# Altium PCB iMX6 Rex Development Baseboard V1I1_PCB.PcbDoc (part 3 of 6)
Units mm, origin at the board's own origin, x right, y up, seen from the top; angles counter-clockwise.
Board outline 135 x 110 mm, 6 copper layers (L1, L2, L3, L4 (PWR), L5, L6), stack 1.542 mm thick; 580 components, 458 nets, 2100 pads, 1201 vias.
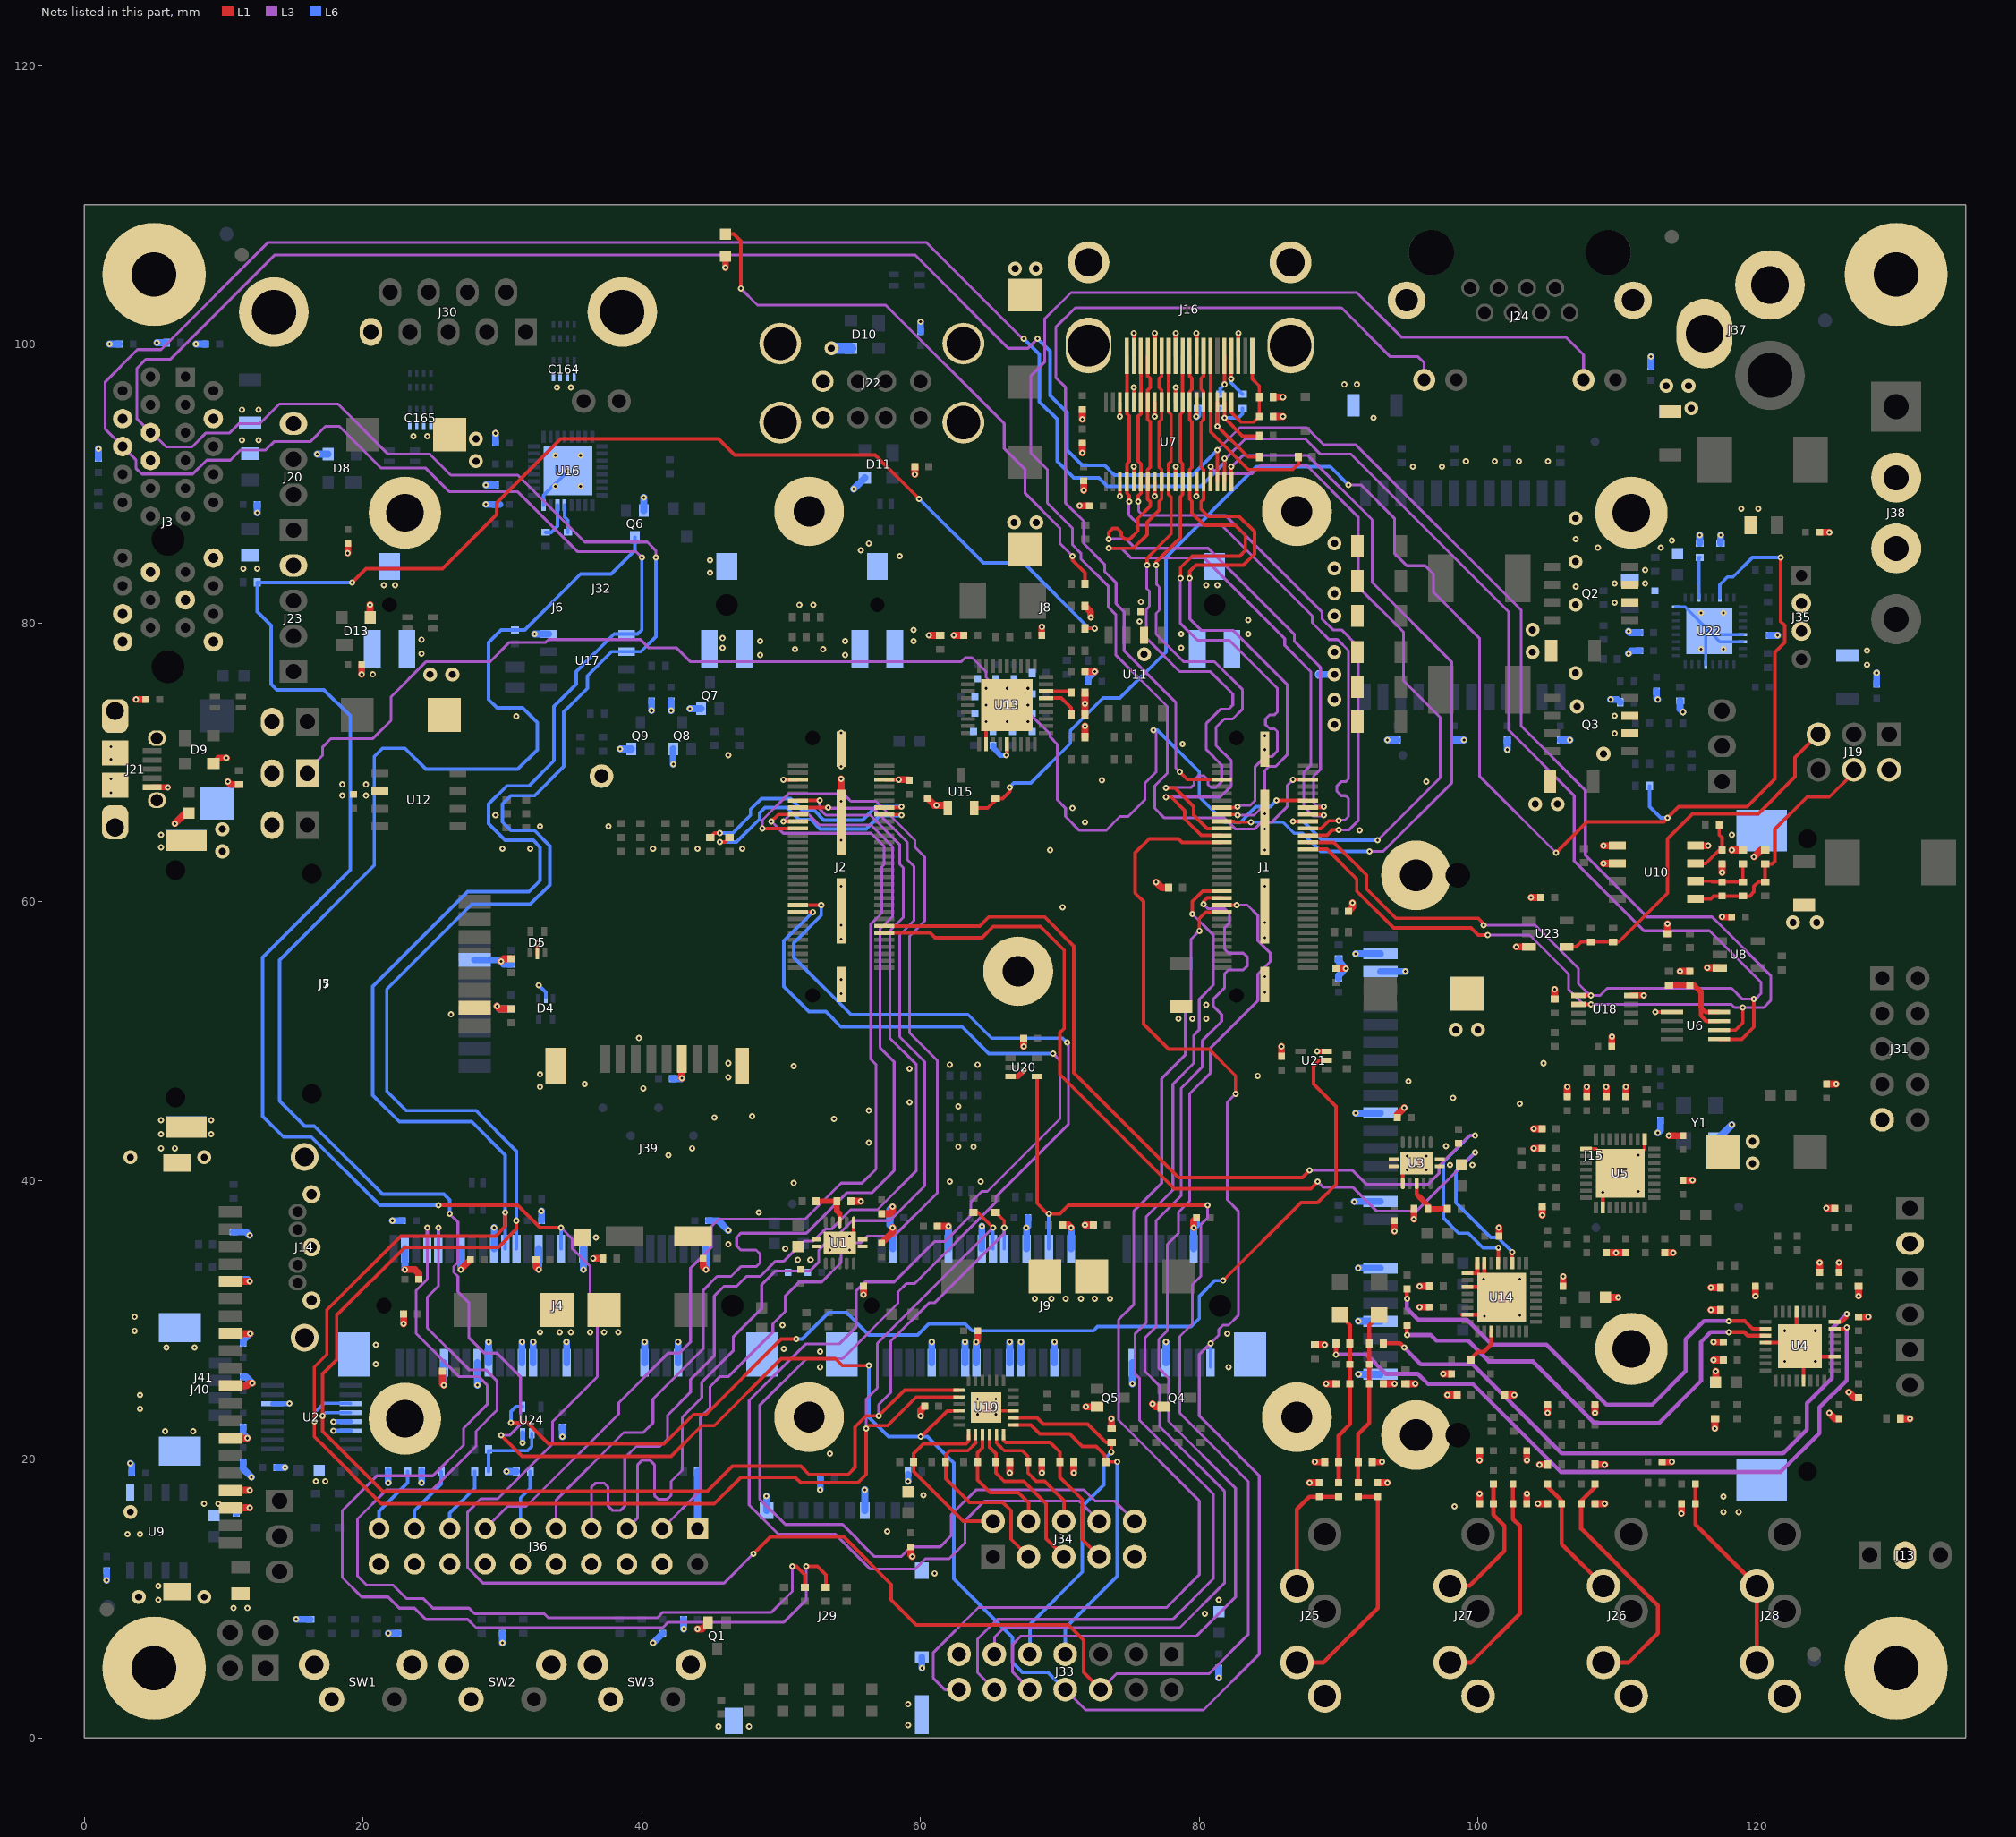
[diagram p7: the nets of this part, all layers, seen from the top]

## Via types
v1: diameter 0.45, hole 0.2, L1 to L6, tented both sides, 1092 vias
v2: diameter 1, hole 0.5, L1 to L6, tented both sides, 109 vias

## Nets (pads, with @x,y where several pads share a name; then routed paths per layer and width w, separated by ;. In a path a pad name is that pad's centre, name@x,y a point inside that pad or via, vN(x,y) a via of type N, cw(c..) or ccw(c..) an arc to the next point about the centre after c; other vN are vias at no path point) (continued)
AUD_OUT_R: C141.1 U14.11 | length 2.9
  L1 w0.3: C141.1@99.5,27.1 99.5,27.2 100,27.7 100.4,27.7 100.95,28.25 U14.11@100.95,29.15
BKLT_ADJ: C84.2 J19.4 R57.1 R59.2 R60.2 U10.1 | length 17.7
  L1 w0.25: U10.1@115.6,60.195 116.695,60.195 116.9,60.4 C84.2@117.5,60.4 R60.2@119,60.4 119.5,60.4 119.8,60.7 119.8,61.1 120.1,61.4 R57.1@120.6,61.4 R59.2@120.6,62.7 121.1,62.7 121.3,62.9 121.3,65.2 123.6,67.5 125.2,67.5 126.96,69.26 J19.4@126.96,69.46
BKLT_IN+: C81.1 R58.1 U10.3 | length 4.2
  L1 w0.25: U10.3@115.6,62.735 116.335,62.735 117.3,63.7 C81.1@117.5,63.7 117.5,64.6 117.3,64.8 R58.1@117.3,65.5
BKLT_IN-: C84.1 R60.1 R61.1 U10.2 | length 4.7
  L1 w0.25: U10.2@115.6,61.465 116.735,61.465 116.8,61.4 C84.1@117.5,61.4 R60.1@119,61.4 R61.1@119,62.7
BOOT_MODE: J1.50 JP2.1 | length 96.4
  L1 w0.25: v1(85.53,67.25) J1.50@87.79,67.25
  L3 w0.2: JP2.1@16,69.2 16,69.4 17.1,70.5 17.1,71.1 17.7,71.7 20.7,71.7 22,73 22,74.7 24.5,77.2 29.1,77.2 30.5,78.6 33.1,78.6 33.3,78.8 39.9,78.8 40.5,78.2 42.5,78.2 43.5,77.2 62.9,77.2 63.2,77.5 63.7,77.5 64.7,76.5 64.7,76.093 66.193,74.6 66.493,74.6 67.593,73.5 67.807,73.5 69.3,72.007 69.3,71.8 69.8,71.3 69.8,67.3 70.4,66.7 70.4,66.1 71.4,65.1 73.3,65.1 74.3,66.1 74.9,66.1 76.1,67.3 76.1,68.5 76.9,69.3 76.9,72.1 v1(76.7,72.3)
  L6 w0.25: v1(76.7,72.3) 77,72.3 80,69.3 80,67.5 81.8,65.7 82.957,65.7 84.057,66.8 85.08,66.8 v1(85.53,67.25)
BUF_LVDS0_CABC: J19.5 R157.1 R158.1 U23.4 | length 27.5
  L1 w0.25: U23.4@106.35,56.75 107.05,56.75 107.4,57.1 R157.1@108.1,57.1 R158.1@109.7,57.1 110.1,57.1 113.6,60.6 113.6,64.5 115.4,66.3 120.1,66.3 122.75,68.95 122.75,70.33 J19.5@124.42,72
BUF_SYS_RSTN: J4.22 J9.22 J33.6 R13.2 R170.2 U20.4 | length 297.1
  L1 w0.25: v1(19.2,82.9) 20.2,83.9 25.7,83.9 29.582,87.782 29.582,88.6 34.182,93.2 ; v1(25.4,38.2) 31.1,38.2 32.7,36.6 v1(34.2,36.6) ; 34.207,93.2 45.5,93.2 46.65,92.05 56.75,92.05 v1(59.9,88.9) ; v1(48,13.2) 49.22,14.42 54.48,14.42 57.9,11 57.9,9.9 59.7,8.1 70.6,8.1 71.7,7 71.7,4.68 J33.6@72.92,3.46 ; U20.4@68.35,47.45 68.35,38.35 69.1,37.6 v1(69.2,37.6) 70,37.6 70.6,38.2 v1(80.6,38.2) ; R170.2@71.8,79.6 v1(72.5,79.6)
  L3 w0.2: v1(34.2,36.6) 35.007,35.793 35.007,35.1 36.3,33.807 36.3,30.8 36.8,30.3 36.8,25.9 33.6,22.7 33.6,21.1 29.65,17.15 28.45,17.15 27.5,16.2 27.5,12.2 28.6,11.1 45.9,11.1 v1(48,13.2) ; J33.6@72.92,3.46 74.06,4.6 80.7,4.6 83.5,7.4 83.5,18.4 78.6,23.3 78.6,28.8 79.5,29.7 79.5,32.5 80.1,33.1 80.1,36.807 80.6,37.307 v1(80.6,38.2)
  L6 w0.25: v1(19.2,82.9) R13.2@12.4,82.9 12.4,80.8 13.4,79.8 13.4,75.6 13.8,75.2 17.2,75.2 19.075,73.325 19.075,62.275 12.8,56 12.8,44.6 14.3,43.1 16.3,43.1 21.2,38.2 v1(25.4,38.2) ; J4.22@34.2,35.1 v1(34.2,36.6) ; v1(59.9,88.9) 64.5,84.3 67.4,84.3 72.1,79.6 v1(72.5,79.6) ; J9.22@69.2,35.1 v1(69.2,37.6)
BUFF_RST_BTNN: U21.2 U24.4 | length 82.3
  L1 w0.25: v1(30.6,22.6) 31.8,22.6 33.3,21.1 41.6,21.1 43.7,23.2 44.593,23.2 49.993,28.6 v1(51.1,28.6) ; v1(81.7,32.8) 87.3,38.4 88.5,38.4 89.8,39.7 89.8,45.3 88.2,46.9 88.2,48.2 88.6,48.6 U21.2@89.15,48.6
  L6 w0.25: v1(30.6,22.6) 30.6,23.4 30.95,23.75 U24.4@31.45,23.75 ; v1(51.1,28.6) 51.5,28.6 53.4,30.5 54.7,30.5 56.3,28.9 59.8,28.9 60.6,29.7 63.2,29.7 63.7,29.2 72.4,29.2 72.7,29.5 79.4,29.5 80,30.1 80,31.7 81.1,32.8 v1(81.7,32.8)
CFG_SEL0: R80.2 U13.24 | length 2.6
  L1 w0.25: U13.24@69,74.6 70.1,74.6 70.8,73.9 R80.2@70.8,73.4
CFG_SEL1: R79.2 U13.25 | length 1.8
  L1 w0.25: U13.25@69,75.1 70.7,75.1 R79.2@70.8,75
CLK1_N: J2.46 R1.1 R2.1 | length 17.4
  L1 w0.25: v1(45.6,64.275) 45.975,64.275 R2.1@46.3,64.6 ; J2.46@57.39,66.25 58.58,66.25 v1(58.63,66.2)
  L6 w0.25: v1@45.625,64.275 46.794,64.275 48.45,65.931 48.45,66.35 48.85,66.75 50.4,66.75 51.281,65.869 52.131,65.869 52.79,65.21 56.104,65.21 57.069,66.175 58.605,66.175 v1(58.63,66.2)
CLK1_P: J2.48 R3.1 R4.1 | length 17.4
  L1 w0.25: R4.1@44.9,64.6 45.225,64.925 v1(45.6,64.925) ; J2.48@57.39,66.75 58.58,66.75 v1(58.63,66.8)
  L6 w0.25: v1(45.6,64.925) 46.525,64.925 47.8,66.2 47.8,66.619 48.581,67.4 50.669,67.4 51.55,66.519 52.4,66.519 53.06,65.86 55.835,65.86 56.8,66.825 58.605,66.825 v1(58.63,66.8)
CPU_INT: J1.37 J9.1 J33.8 Q6.3 R112.2 U19.22 | length 256.9
  L1 w0.24: 62.2,23.45 U19.22@62.75,23.45
  L1 w0.25: v1(29.9,21.7) 31.4,20.2 42.1,20.2 44.3,22.4 45.2,22.4 50,27.2 53.9,27.2 54.4,26.7 v1(56.3,26.7) ; v1(60,21.6) 60.05,21.6 61.9,23.45 62.2,23.45 ; J1.37@81.61,64.25 78.75,64.25 78.5,64.5 76.4,64.5 75.4,63.5 75.4,60.6 76,60 76,51.2 77.8,49.4 80.7,49.4 82.6,47.5 v1(82.6,46.2)
  L3 w0.2: v1(26.2,37.6) 26.8,37 26.8,34.107 26.5,33.807 26.5,33.393 26.793,33.1 26.8,33.1 26.8,32 27.6,31.2 27.6,28.7 28.7,27.6 29.6,27.6 31.3,25.9 31.3,22.5 30.5,21.7 v1(29.9,21.7) ; J33.8@70.38,3.46 71.84,2 80.3,2 84.3,6 84.3,18.8 80,23.1 80,27.5 v1(80.8,28.3) 81.4,28.9 81.4,29.3 81.7,29.6 82.1,29.6 82.8,30.3 82.8,37.8 82,38.6 82,45.6 v1(82.6,46.2)
  L6 w0.25: v1(26.2,37.6) 26.2,38.6 25.8,39 21.4,39 16.5,43.9 15.8,43.9 14,45.7 14,55.8 20.8,62.6 20.8,70.407 21.393,71 23,71 24.5,69.5 31.1,69.5 32.5,70.9 32.5,72.85 31.45,73.9 29.6,73.9 29,74.5 29,78.6 29.9,79.5 R112.2@30.9,79.5 31.6,79.5 35.6,83.5 37.8,83.5 39.5,85.2 Q6.3@39.5,86.15 ; v1(56.3,26.7) 56.3,23 57.7,21.6 v1(60,21.6) 60.507,21.6 62.4,19.707 62.4,11.4 66.6,7.2 66.6,5.4 67.3,4.7 69.14,4.7 J33.8@70.38,3.46 ; J9.1@80.8,26.6 v1(80.8,28.3)
CRFILT: C107.1 U13.14 | length 2.1
  L1 w0.25: v1(66.15,70.5) 66.2,70.55 U13.14@66.2,71.3
  L6 w0.4: C107.1@65.2,71.2 65.2,71.05 65.75,70.5 v1(66.15,70.5)
CSPI2_CLK: J1.17 J33.14 | length 79.1
  L1 w0.25: v1(80,57.9) 80,58.8 80.45,59.25 J1.17@81.61,59.25
  L3 w0.2: J33.14@62.76,3.46 61.74,3.46 60.9,4.3 60.9,6.1 64.15,9.35 77.65,9.35 80,11.7 80,17 74.2,22.8 74.2,30 75.3,31.1 75.3,37.8 77.3,39.8 77.3,47.3 79,49 79,52.5 79.4,52.9 79.4,57.3 v1(80,57.9)
CSPI2_CS0: J1.19 J33.10 | length 78.9
  L1 w0.25: J1.19@81.61,59.75 v1(82.67,59.75)
  L3 w0.2: J33.10@67.84,3.46 66.6,4.7 66.6,6.7 67.2,7.3 79.8,7.3 82.6,10.1 82.6,17.9 77.8,22.7 77.8,25.8 77.1,26.5 77.1,28.607 77.7,29.207 77.7,35.4 78.5,36.2 78.5,37.7 79.3,38.5 79.3,46.2 80.8,47.7 80.8,49.5 84.2,52.9 84.2,54.807 85.1,55.707 85.1,56.293 84.2,57.193 84.2,59 83.45,59.75 v1(82.67,59.75)
CSPI2_MISO: J1.21 J33.11 | length 79.1
  L1 w0.25: v1(80.3,59.8) 80.3,60 80.55,60.25 J1.21@81.61,60.25
  L3 w0.2: J33.11@65.3,6 65.3,7.2 66,7.9 78.6,7.9 81.8,11.1 81.8,17.7 77.15,22.35 77.15,25.25 76.1,26.3 76.1,28.7 76.9,29.5 76.9,37.1 78.7,38.9 78.7,46.6 80.2,48.1 80.2,50 81.6,51.4 81.6,51.9 81,52.5 81,53 81.8,53.8 81.8,54.8 82.1,55.1 83.16,55.1 83.46,55.4 83.46,56 83.16,56.3 82.1,56.3 81.8,56.6 81.8,58.1 82.17,58.47 82.17,59.13 81.8,59.5 80.6,59.5 v1(80.3,59.8)
CSPI2_MOSI: J1.23 J33.12 | length 79.1
  L1 w0.25: v1(79.5,59.1) 79.5,60 80.25,60.75 J1.23@81.61,60.75
  L3 w0.2: J33.12@65.3,3.46 64.1,4.66 64.1,7.1 65.5,8.5 78.1,8.5 81,11.4 81,17.5 75.7,22.8 75.7,25.8 75.4,26.1 75.4,29 76.2,29.8 76.2,37.4 78.1,39.3 78.1,46.9 79.6,48.4 79.6,50.4 80,50.8 80,53 81,54 81,57.607 v1@79.504,59.104
EN_5V: R128.2 R154.1 U15.2 U22.14 | length 119.7
  L1 w0.25: U15.2@63.75,66.715 64.815,66.715 R128.2@65.5,67.4 ; R128.2@65.4,67.4 R128.2@65.5,67.4 ; v1(66.4,68.2) 66.4,67.9 65.9,67.4 R128.2@65.5,67.4 ; v1(105.6,63.5) 107.825,65.725 113.325,65.725 v1(113.6,66) 114.4,66.8 119.3,66.8 121.293,68.793 121.293,77.893 122,78.6 122,79.8 121.7,80.1 v1(121.7,84.7)
  L3 w0.2: v1(90.7,89.9) 91.6,89.9 94,87.5 94,85 94.9,84.1 96.2,84.1 96.8,83.5 96.8,82.2 100.1,78.9 100.1,69 v1(105.6,63.5)
  L6 w0.23: U22.14@117.35,81.8 117.35,82.743 117.707,83.1
  L6 w0.25: v1(66.4,68.2) 66.7,68.5 67.9,68.5 70.75,71.35 70.75,72.257 73.093,74.6 74.3,74.6 77.6,77.9 77.6,84.7 84.1,91.2 89.4,91.2 v1(90.7,89.9) ; R154.1@112.3,68.3 112.3,66.8 113.1,66 v1(113.6,66) ; 117.707,83.1 117.9,83.293 118.293,83.293 119.7,84.7 v1(121.7,84.7)
ENET_LED_LINK: J1.56 J24.11 | length 97
  L1 w0.25: v1(86.73,68.75) J1.56@87.79,68.75
  L3 w0.2: v1(86.73,68.75) 86.3,68.32 86.3,66.8 85.2,65.7 84.45,65.7 83.95,65.2 82.6,65.2 81.8,66 77.5,66 76.8,66.7 76.8,68.3 77.7,69.2 77.7,74 74,77.7 74,80.607 73.475,81.132 73.475,82.621 71.5,84.596 71.5,85 70.9,85.6 70.9,86.8 69.1,88.6 69.1,91 67.9,92.2 67.9,97.7 68.9,98.7 68.9,101.8 70.8,103.7 91.3,103.7 94.5,100.5 106.3,100.5 107.57,99.23 J24.11@107.57,97.43
ENET_LED_RX: J1.55 J24.9 | length 68.7
  L1 w0.25: v1(78.6,69.3) 79.15,68.75 J1.55@81.61,68.75
  L3 w0.2: v1(78.6,69.3) 78.3,69.6 78.3,74.3 74.6,78 74.6,80.8 74.025,81.375 74.025,82.875 73.2,83.7 73.2,84.2 71.7,85.7 71.7,87.3 70.4,88.6 70.4,96.9 69.7,97.6 69.7,101.2 71.1,102.6 90.2,102.6 93.7,99.1 95.7,99.1 96.14,98.66 J24.9@96.14,97.43
FB1_5V: R130.2 U22.11 | length 2.9
  L6 w0.23: U22.11@115.85,81.8 115.85,82.75
  L6 w0.25: 115.85,82.75 115.85,84.65 R130.2@115.9,84.7
FB_+1V5: R18.1 R20.2 U1.8 | length 3.2
  L1 w0.28: U1.8@54.2,36.975 54.2,37.6
  L1 w0.4: R18.1@52.5,38.5 R20.2@54,38.5 54,37.8 54.2,37.6 54.2,37.5
FB_+1V8_AUDIO2: R26.1 R27.2 U3.8 | length 3.6
  L1 w0.28: U3.8@95.6,39.775 95.6,38.995 95.745,38.85
  L1 w0.4: 95.745,38.85 96.4,38.195 R27.2@96.4,37.95 R26.1@97.8,37.95
FIL_AUD_OUT_L: C146.1 FB17.2 J27.2 | length 16
  L1 w0.3: J27.2@98,5.4 99.5,5.4 103,8.9 103,15.2 102.5,15.7 C146.1@102.5,16.8 FB17.2@102.5,18.2
FIL_AUD_OUT_R: C145.1 FB16.2 J27.3 | length 10.1
  L1 w0.3: J27.3@98,10.9 99.4,10.9 101.9,13.4 101.9,15.2 101.1,16 C145.1@101.1,16.8 FB16.2@101.1,18.2
FIL_HP_OUTL: C123.1 FB9.2 J25.2 | length 16.8
  L1 w0.3: J25.2@87,5.4 88.9,5.4 92.8,9.3 C123.1@92.8,17.3 FB9.2@91.4,17.3
FIL_HP_OUTR: C122.1 FB8.2 J25.3 | length 8.9
  L1 w0.3: J25.3@87,10.9 87,16.4 87.9,17.3 C122.1@88.6,17.3 FB8.2@90,17.3
FIL_LINEIN_L: C135.1 FB15.2 J26.2 | length 18.2
  L1 w0.3: FB15.2@108.4,18.2 108.4,18 107.4,17 C135.1@107.4,16.8 107.4,15 112.9,9.5 112.9,7.5 110.8,5.4 J26.2@109,5.4
FIL_LINEIN_R: C134.1 FB14.2 J26.3 | length 9
  L1 w0.3: FB14.2@105,18.2 105,18 106,17 C134.1@106,16.8 106,13.9 J26.3@109,10.9
FIL_MIC_IN: C149.1 FB18.2 J28.2 J28.3 | length 14.6
  L1 w0.3: FB18.2@115.6,18.2 C149.1@115.6,16.8 115.6,15.3 J28.3@120,10.9 J28.2@120,5.4
FORCEOFFN: R108.1 U16.21 | length 2.1
  L6 w0.25: U16.21@34.45,88.45 34.45,87.6 34.7,87.35 R108.1@34.7,86.5
FORCEON: R109.1 U16.22 | length 2.5
  L6 w0.25: R109.1@33.1,86.5 33.5,86.5 33.95,86.95 U16.22@33.95,88.45
GND: C1.2 C2.2 C3.2 C4.2 C5.2 C6.2 C7.2 C8.2 C9.2 C10.2 C11.2 C12.2 C13.2 C14.2 C15.2 C16.2 C17.2 C18.2 C19.2 C20.2 C21.2 C22.2 C23.2 C24.2 C25.2 C26.2 C27.2 C28.2 C29.2 C30.2 C31.2 C32.2 C33.2 C34.2 C35.2 C36.2 C37.2 C38.2 C39.2 C40.2 C41.2 C42.2 C43.2 C44.2 C45.2 C46.2 C49.2 C50.2 C51.2 C54.2 C57.2 C58.2 C61.2 C62.2 C63.2 C64.1 C65.1 C67.1 C68.1 C69.2 C70.2 C71.2 C72.2 C73.2 C74.2 C75.2 C76.2 C77.2 C78.2 C79.2 C80.2 C81.2 C82.2 C83.2 C85.2 C86.2 C87.2 C88.2 C89.2 C90.2 C91.2 C92.2 C93.2 C94.2 C95.2 C96.2 C97.2 C98.2 C99.1 C100.1 C101.2 C102.1 C103.2 C104.1 C105.2 C106.2 C107.2 C108.2 C109.2 C110.2 C111.2 C112.2 C113.1 C114.1 C115.2 C116.1 C117.1 C118.1 C119.2 C122.2 C123.2 C124.2 C125.2 C126.2 C127.2 C128.2 C129.2 C132.2 C133.2 C134.2 C135.2 C140.2 C143.1 C144.1 C145.2 C146.2 C147.2 C149.2 C150.2 C151.2 C152.2 C153.2 C154.2 C155.2 C156.2 C157.2 C158.2 C159.2 C161.2 C163.2 C164.1 C164.2 C164.3 C164.4 C165.1 C165.2 C165.3 C165.4 C166.2 C167.2 C168.2 C169.1 C170.1 C171.2 C172.2 C173.2 C174.2 C175.2 C176.2 C177.2 C178.2 C179.2 C180.2 C181.2 C182.2 C183.2 C184.2 C185.2 C188.2 C189.2 C190.2 C191.2 C192.2 C193.2 C194.2 C195.2 C196.2 C197.2 C198.2 C199.2 C200.2 C201.2 C202.2 C203.2 C204.2 C205.2 C206.2 C207.2 C208.2 C209.1 C211.1 C213.2 C214.2 C215.2 C216.2 C217.2 C218.2 D4.2 D5.2 D8.3 D9.3 D10.3 D11.3 D12.1 D13.3 D19.2 J1.61 J1.62 J1.63 J1.64 J2.55 J2.56 J2.61 J2.62 J2.63 J2.64 J3.A4 J3.A12 J3.A15 J3.A18 J3.B4 J3.B7 J3.B13 J3.B16 J3.B18 J4.4 J4.9 J4.15 J4.18 J4.21 J4.26 J4.27 J4.29 J4.34 J4.35 J4.37 J4.40 J4.43 J4.50 J4.53 J4.54 J5.1 J5.2 J5.C5 J6.1 J6.2 J6.3 J6.4 J6.5 J6.6 J7.1 J7.2 J7.C5 J8.1 J8.2 J8.3 J8.4 J8.5 J8.6 J9.4 J9.9 J9.15 J9.18 J9.21 J9.26 J9.27 J9.29 J9.34 J9.35 J9.37 J9.40 J9.43 J9.50 J9.53 J9.54 J11.2 J13.2 J14.1 J14.4 J14.7 J14.8 J14.9 J15.C1 J15.C2 J15.H1 J15.H3 J15.PC2 J15.PC7 J15.PC15 J15.PC16 J15.S1 J15.S4 J15.S7 J16.2 J16.5 J16.8 J16.11 J16.17 J16.MTG1 J16.MTG2 J16.MTG3 J16.MTG4 J19.2 J20.4 J21.5 J21.6 J21.7 J21.8 J21.9 J21.10 J21.11 J22.4 J22.8 J22.9 J22.10 J22.11 J22.12 J23.4 J24.13 J24.14 J25.1 J26.1 J27.1 J28.1 J29.6 J29.10 J29.11 J29.12 J29.13 J29.14 J30.5 J30.10 J30.11 J31.9 J32.1 J33.13 J34.9 J35.2 J35.3 J36.4 J36.6 J36.8 J36.10 J36.12 J36.14 J36.16 J36.18 J36.20 J37.2 J37.3 J38.2 J38.3 J39.6 J39.10 J39.11 J39.12 J39.13 J40.5 J40.6 J41.3 J41.4 J41.7 J41.10 J41.13 J41.16 J41.21 J41.22 JP1.2 JP2.2 JP3.2 MH1.1 MH2.1 MH3.1 MH4.1 MH5.1 MH6.1 MH7.1 MH8.1 MH9.1 MH10.1 MH11.1 MH12.1 MH13.1 Q1.2 Q2.2 Q2.3 Q3.2 Q3.3 Q4.2 Q5.2 Q6.2 Q7.2 Q8.2 Q9.2 R6.2 R20.1 R24.2 R27.1 R32.1 R34.1 R35.1 R45.1 R47.1 R54.1 R55.1 R59.1 R61.2 R74.2 R76.2 R79.1 R80.1 R81.2 R82.1 R83.1 R90.1 R91.1 R92.1 R93.1 R96.1 R97.1 R100.1 R101.1 R104.1 R105.1 R106.1 R115.2 R121.1 R122.1 R130.1 R131.2 R132.1 R139.1 R155.1 R156.1 R162.2 R166.1 R168.1 R176.1 R180.1 R181.1 R182.1 R186.1 SW1.1 SW1.3 SW1.4 SW2.1 SW2.3 SW2.4 SW3.1 SW3.3 SW3.4 TP10.1 U1.6 U1.11 U1.12 U1.13 U1.14 U1.15 U2.6 U2.13 U2.14 U3.6 U3.11 U3.12 U3.13 U3.14 U3.15 U4.5 U4.11 U4.21 U4.28 U4.33 U5.1 U5.9 U5.18 U5.33 U6.1 U7.3 U7.5 U7.8 U7.11 U7.14 U7.25 U7.28 U7.31 U7.34 U7.36 U8.3 U9.1 U10.4 U10.5 U10.6 U11.6 U12.6 U13.11 U13.37 U14.1 U14.3 U14.7 U14.31 U14.32 U14.33 U15.1 U16.24 U16.33 U17.4 U18.4 U19.9 U19.25 U20.3 U21.3 U22.8 U22.21 U22.22 U22.29 U22.33 U23.3 U24.3 Y1.2 | length 314.5
  L1 w0.24: U19.25@64.7,23.7 64.95,23.45 U19.9@66.65,23.45
  L1 w0.25: D5.2@32.5,56.175 v1(32.5,57) ; U5.9@107.75,42.25 108.45,42.25 v1(110.2,40.5) ; U5.33@108.95,39.25 v1(110.2,40.5) ; U5.1@111.95,42.95 111.95,42.25 v1(110.2,40.5) ; v1(112.725,52.075) U6.1@113.9,52.075
  L1 w0.28: U1.11@55.2,36.1 U1.6@55.2,36.975 ; U13.11@64.7,71.3 U13.37@64.7,72.6 ; v1(74.3,89.1) U7.3@74.3,90.15 ; v1(74.3,94.8) U7.36@74.3,95.85 ; U7.5@75.3,90.15 v1(75.3,91.2) ; U7.34@75.3,95.85 v1(75.3,96.9) ; v1(76.8,89.1) U7.8@76.8,90.15 ; v1(76.8,94.8) U7.31@76.8,95.85 ; U7.11@78.3,90.15 v1(78.3,91.2) ; U7.28@78.3,95.85 v1(78.3,96.9) ; v1(79.8,89.1) U7.14@79.8,90.15 ; v1(79.8,94.8) U7.25@79.8,95.85 ; U3.6@94.6,39.775 U3.11@94.6,41 ; U4.28@120.625,28.35 U4.33@122.85,28.35 ; U4.21@122.85,30.575 U4.33@122.85,28.35 ; U4.5@123.35,25.625 U4.33@123.35,27.85 ; U4.11@125.575,27.35 123.85,27.35 U4.33@123.35,27.85 ; U4.33@122.85,28.35 v1(123.1,28.1) U4.33@123.35,27.85
  L1 w0.3: v1(50.15,68.75) J2.55@51.21,68.75 ; J2.56@57.39,68.75 v1(58.45,68.75) ; J16.2@75.3,99.14 v1(75.3,100.79) ; J16.5@76.8,99.14 v1(76.8,100.79) ; J16.8@78.3,99.14 v1(78.3,100.79) ; J16.11@79.8,99.14 v1(79.8,100.79) ; J16.17@82.8,99.14 v1(82.8,100.79) ; U14.7@98.85,30.35 100.45,30.35 v1(101.7,31.6) U14.33@100.95,32.35 ; U14.3@99.25,32.35 U14.33@100.95,32.35 ; U14.1@99.25,33.35 U14.33@99.95,33.35 ; U14.32@99.95,34.05 U14.33@99.95,33.35 ; U14.33@100.45,32.9 U14.31@100.45,34.05 ; U5.18@108.95,38.05 U5.33@108.95,39.25 ; U14.33@99.95,33.35 U14.33@100.95,32.35
  L1 w0.4: J21.5@4.875,68.2 v1(6,68.2) ; U20.3@66.45,47.45 66.95,47.45 v1(67.4,47.9) ; v1(88.45,49.25) U21.3@89.15,49.25 ; U18.4@111,53.275 v1(111.9,53.275)
  L1 w0.5: v1(3.7,74.5) C88.2@4.4,74.5 ; v1(6.5,65.6) D19.2@7.2,66.3 ; D19.2@7.25,66.35 D19.2@7.5,66.35 ; D9.3@9.25,69.9 9.65,70.3 v1(10.2,70.3) ; v1(10.3,68.6) 10.5,68.4 R74.2@11.1,68.4 ; J41.3@10.5,16.5 v1(11.85,16.5) ; J41.4@10.5,17.75 v1(11.85,17.75) ; J41.7@10.5,21.5 v1(11.7,21.5) ; J41.10@10.5,25.25 11.65,25.25 11.85,25.45 v1(12.05,25.45) ; J41.13@10.5,29 v1(11.9,29) ; J41.16@10.5,32.75 v1(11.85,32.75) ; v1(18.9,85) C86.2@18.9,85.7 ; v1(19.9,76.3) C97.2@19.9,77 ; D13.3@20.5,80.4 v1(20.5,81.3) ; v1(22.9,29.7) C16.2@22.9,30.4 ; v1(23,33.6) 23.7,33.6 24,33.3 C17.2@24,32.9 ; C202.2@25.7,26.3 25.7,25.4 v1(25.8,25.3) ; v1(27,33.6) C215.2@27.7,34.3 ; v1(29.6,52.5) 29.8,52.3 C28.2@30.6,52.3 ; v1(29.9,55.7) 30.1,55.9 C106.2@30.6,55.9 ; C201.2@32.4,34.3 32.4,33.8 v1(32.6,33.6) ; v1@36.6,34.4 R104.1@37.2,34.4 ; v1(42.875,47.325) J39.6@42.875,48.7 ; v1(44,7.8) 44.3,7.8 Q1.2@44.75,8.25 ; C216.2@44.4,34.4 44.4,33.8 v1(44.6,33.6) ; v1(46,105.5) D12.1@46,106.3 ; J2.63@54.3,65.675 v1(54.3,67.2) v1(54.3,68.8) ; R20.1@55,38.5 v1(55.7,38.5) ; v1(55.9,31.8) C19.2@55.9,32.4 ; C27.2@57.2,35.5 58,36.3 v1(58,36.6) ; C21.2@57.2,37.6 57.8,37.6 58,37.8 v1(58,38.1) ; v1(58.45,68.75) 59.15,68.75 C4.2@59.2,68.7 ; C175.2@59.3,13.7 59.3,13.1 v1(59.4,13) ; v1(59.6,90.65) C94.2@59.6,91.2 ; v1(60,23.1) 60,23.5 C169.1@60.3,23.8 ; C207.2@60.5,67.4 60.985,66.915 v1(61.15,66.915) 61.75,66.915 U15.1@61.95,66.715 ; v1@60.7,79.1 R81.2@61.4,79.1 ; C217.2@61.2,36.7 v1(62,36.7) ; v1(62.4,79.1) C99.1@63.1,79.1 ; v1(64,28.4) 64.1,28.5 C206.2@64.1,29.2 ; v1(66.4,19) R180.1@66.4,19.8 ; v1(67.4,49.6) C171.2@67.4,50.2 ; v1(68.7,19) R182.1@68.7,19.8 ; C100.1@68.7,79.1 v1(68.7,79.7) ; C218.2@70.2,36.8 70.6,36.8 v1(70.8,36.6) ; v1(71,19) R181.1@71,19.8 ; v1(71.4,88.4) C72.2@72.1,88.4 ; v1(71.6,92.2) C73.2@71.6,92.9 ; v1(71.6,94.6) C74.2@71.6,95.3 ; v1(71.7,89.5) C71.2@71.7,90.2 ; v1(71.8,36.8) C26.2@72.4,36.8 ; R83.1@71.8,71.8 v1(71.8,72.6) ; R80.1@71.8,73.4 v1(71.8,74.2) R79.1@71.8,75 ; C98.2@71.8,76.5 v1(72.5,76.5) ; R82.1@71.8,81.2 72.2,80.8 v1(72.2,80.4) ; v1(71.85,23.75) Q5.2@72.65,23.75 ; R176.1@73.7,22.2 v1(73.7,22.9) ; v1(76.65,23.95) 76.85,23.75 Q4.2@77.45,23.75 ; v1(76.9,61.4) 77.3,61 R105.1@77.8,61 ; v1(79.6,36.6) 79.6,37.1 C205.2@79.8,37.3 ; C108.2@85.3,94.8 v1(86,94.8) ; R47.1@85.3,96.2 v1(86,96.2) ; C176.2@85.9,48.9 v1(85.9,49.6) ; v1(87.9,18.3) C122.2@88.6,18.3 ; v1(88.3,19.8) R90.1@89,19.8 ; R92.1@88.3,28.2 v1(89,28.2) ; v1(89.1,25.4) C124.2@89.8,25.4 ; C1.2@89.8,55.2 v1(90.5,55.2) ; C3.2@90.7,59.3 C3.2@90.9,59.5 ; 91,59.6 v1(91,59.9) ; R91.1@92.4,19.8 v1(93.1,19.8) ; C123.2@92.8,18.3 v1(93.5,18.3) ; C125.2@93.2,25.4 v1(94,25.4) ; v1(94,36.35) C36.2@94,37.1 ; C34.2@94.2,44.5 94.2,44.7 v1(94.7,45.2) ; R93.1@94.8,25.4 v1(95.5,25.4) ; v1(95.4,37.2) R27.1@95.4,37.95 ; v1(95.8,30.9) C129.2@96.5,30.9 ; v1(95.8,32.4) R24.2@96.5,32.4 ; v1(97.5,26.1) C140.2@98.1,26.1 ; v1(97.8,24.6) R100.1@98.5,24.6 ; C145.2@100.1,16.8 v1(100.1,17.5) ; v1(100.1,19.9) C143.1@100.1,20.6 ; C128.2@101.5,36 v1(101.5,36.6) ; R101.1@101.9,24.6 v1(102.6,24.6) ; v1(102.75,56.75) U23.3@103.65,56.75 ; C146.2@103.5,16.8 v1(103.5,17.5) ; v1(103.5,19.9) C144.1@103.5,20.6 ; v1(103.8,60.3) C213.2@104.5,60.3 ; v1(104,42.3) C65.1@104.6,42.3 ; v1(104,43.7) C46.2@104.6,43.7 ; v1(104.3,16.8) C134.2@105,16.8 ; v1(104.4,19.6) R96.1@105,19.6 ; v1(104.6,37.5) C64.1@104.6,38.1 ; v1(105,23.3) C132.2@105,23.9 ; R115.2@105.5,53 v1(105.5,53.7) ; C127.2@106.1,32.4 v1@106.1,33.075 ; C63.2@106.4,46 v1(106.4,46.7) ; C61.2@107.8,46 v1(107.8,46.7) ; C135.2@108.4,16.8 v1(109.1,16.8) ; R97.1@108.4,19.6 v1(109.1,19.6) ; v1(108.4,23.3) C133.2@108.4,23.9 ; v1(109,62.735) U10.6@110,62.735 ; v1(109,64.005) U10.5@110,64.005 ; C126.2@109.15,31.6 v1(110.05,31.6) ; C211.1@109.2,34.8 v1(109.9,34.8) C209.1@110.6,34.8 ; C62.2@109.2,46 v1(109.2,46.7) ; C170.1@109.6,49.6 v1(109.6,50.3) ; C45.2@110.6,46 v1(110.6,46.7) ; C147.2@113.2,19.8 v1(113.9,19.8) ; C51.2@113.4,34.8 v1(114,34.8) ; R166.1@113.6,57.7 v1(113.6,58.4) ; v1(113.7,43.2) C44.2@114.7,43.2 ; v1(114.5,55) C57.2@115.2,55 ; v1(114.6,16.1) C149.2@114.6,16.8 ; C50.2@114.7,40 v1(115.4,40) ; U10.4@115.6,64.005 v1(116.5,64.005) ; v1(116.45,55.25) U8.3@117.35,55.25 ; v1(116.7,30.7) R32.1@117.4,30.7 ; v1(116.7,32.3) R34.1@117.4,32.3 ; v1(116.9,27.1) C37.2@117.6,27.1 ; v1(116.9,28.4) C68.1@117.6,28.4 ; v1(117,22.2) R35.1@117,22.9 ; C43.2@117.05,25.5 v1(117.05,26.3) ; v1(117.5,58.9) C75.2@118.2,58.9 ; v1(117.5,62.1) C81.2@117.5,62.7 ; v1(118.2,63.7) R61.2@119,63.7 ; v1(119.8,63.2) 120.3,63.7 R59.1@120.6,63.7 ; v1(119.9,31.7) C67.1@119.9,32.4 ; C39.2@124.5,33.5 v1(124.5,34.1) ; C178.2@124.5,86.5 v1(125.2,86.5) ; v1(125,38) C54.2@125.6,38 ; C166.2@125,46.9 v1(125.7,46.9) ; v1(125.2,23.3) 125.6,22.9 C38.2@125.9,22.9 ; C41.2@125.9,33.4 v1(125.9,34.1) ; v1(126.6,24.8) 127,24.4 C42.2@127.3,24.4 ; C58.2@127.3,30.2 v1(128,30.2) ; v1(127.3,31.7) R155.1@127.3,32.4 ; R156.1@130.3,22.9 v1(131,22.9)
  L6 w0.23: U22.8@114.2,81.15 114.85,81.15 U22.33@116.6,79.4 ; U22.29@116.35,77 116.35,79.15 U22.33@116.6,79.4 ; U22.22@119,78.65 117.35,78.65 U22.33@116.85,79.15 ; U22.21@119,79.15 U22.33@116.85,79.15 ; U22.33@116.6,79.4 U22.33@116.85,79.15
  L6 w0.25: v1(32.6,54) 33.1,53.5 D4.2@33.1,53.125 ; U16.24@32.95,88.45 32.95,89.15 v1(34.7,90.9)
  L6 w0.35: U2.6@13.5,23.975 v1(14.725,23.975) ; v1(17.875,22.025) U2.14@19.1,22.025 ; v1(17.875,22.675) U2.13@19.1,22.675
  L6 w0.4: v1(31.45,21.15) U24.3@31.45,21.85
  L6 w0.5: C6.2@1,91.8 v1(1,92.5) ; v1(1.6,11.3) C78.2@1.6,12 ; v1(1.8,100) C8.2@2.5,100 ; v1(3.298,19.7) 3.4,19.598 C80.2@3.4,19 ; v1(5.2,100.1) R6.2@5.9,100.1 ; v1(8,100) C9.2@8.7,100 ; R55.1@10.7,32.9 11.7,32.9 v1(11.85,32.75) ; R54.1@10.7,36.3 11.6,36.3 v1(11.85,36.05) ; C77.2@10.9,16.1 11.3,16.5 v1(11.85,16.5) ; C152.2@11.4,19.8 11.4,19.3 v1(12,18.7) ; C154.2@11.4,22.3 11.4,21.8 v1(11.7,21.5) ; C155.2@11.4,25.9 11.6,25.9 v1(12.05,25.45) ; C153.2@11.4,28.3 11.4,28.5 v1(11.9,29) ; v1(12.4,87.9) C10.2@12.4,88.5 ; C151.2@13.8,19.4 v1(14.4,19.4) ; v1(15.2,8.5) R168.1@16.2,8.5 ; v1(16.7,92.1) D8.3@17.5,92.1 ; v1(21.8,7.5) C198.2@22.5,7.5 ; v1(21.8,18.3) R186.1@21.8,19.1 ; v1(22.1,37.1) C204.2@22.8,37.1 ; v1(23,33.6) J4.50@23,35.1 ; v1(24.2,18.3) R122.1@24.2,19.1 ; v1(25.8,25.3) J4.43@25.8,26.9 ; v1(27,33.6) J4.40@27,35.1 ; J5.C5@28,55.82 29.78,55.82 v1(29.9,55.7) 30.1,55.5 C22.2@30.6,55.5 ; v1(28.2,25.3) J4.37@28.2,26.9 ; v1(28.8,88.5) C163.2@29.5,88.5 29.8,88.5 ; v1(28.8,89.9) C159.2@29.5,89.9 ; J4.35@29,26.9 v1(29,28.4) ; J4.34@29.4,35.1 v1(29.4,36.6) ; C161.2@29.5,92.9 v1(29.5,93.6) ; v1(29.6,52.5) 29.8,52.3 C23.2@30.6,52.3 ; v1(30,6.8) C199.2@30,7.5 ; v1(30.3,19.1) R121.1@31,19.1 ; J4.29@31.4,26.9 v1(31.4,28.4) ; J4.27@32.2,26.9 v1(32.2,28.4) ; v1(32.305,79.205) U17.4@33.3,79.205 ; v1(32.6,33.6) J4.26@32.6,35.1 ; C203.2@32.8,37.1 v1(32.8,37.8) ; v1(34.3,21.6) C214.2@34.3,22.3 ; J4.21@34.6,26.9 v1(34.6,28.4) ; v1(35.8,33.6) J4.18@35.8,35.1 ; v1(38.45,70.95) Q9.2@39.25,70.95 ; Q6.2@40.15,88.05 v1(40.15,89) ; J4.15@40.2,26.9 v1(40.2,28.4) ; v1(40.7,73.7) C167.2@40.7,74.4 ; v1(40.8,6.8) C200.2@41.5,7.5 ; v1(42.1,73.7) C168.2@42.1,74.4 ; C157.2@42.2,47.3 42.85,47.3 v1(42.875,47.325) ; v1(42.25,69.85) Q8.2@42.25,70.95 ; J4.9@42.6,26.9 v1(42.6,28.4) ; v1(43,7.8) C156.2@43,8.5 ; v1(43.45,73.85) Q7.2@44.25,73.85 ; v1(44.6,33.6) J4.4@44.6,35.1 ; C14.2@44.8,37.1 45.5,37.1 v1(46.2,36.4) ; J29.14@48.95,16.3 v1(48.95,17.35) ; v1(52.8,17.8) C158.2@52.8,18.6 ; v1(55.2,89.6) D11.3@56,90.4 ; J29.6@56,16.3 v1(56,17.8) ; J9.50@58,35.1 v1(58,36.6) 57.8,36.8 C29.2@57.8,37.3 57.8,37.9 v1(58,38.1) ; v1(59.1,18.4) R106.1@59.1,18.9 ; C93.2@60,100.9 v1(60,101.6) ; v1(60.1,5) J29.11@60.1,5.8 ; J9.43@60.8,26.9 v1(60.8,28.4) ; J9.40@62,35.1 v1(62,36.7) ; J9.37@63.2,26.9 v1(63.2,28.4) ; J9.35@64,26.9 v1(64,28.4) ; J9.34@64.4,35.1 v1(64.4,36.7) ; J9.29@66.4,26.9 v1(66.4,28.4) ; J9.27@67.2,26.9 v1(67.2,28.4) ; J9.26@67.6,35.1 v1(67.6,36.6) 67.7,36.7 C31.2@67.7,37.3 ; J9.21@69.6,26.9 v1(69.6,28.4) ; J9.18@70.8,35.1 v1(70.8,36.6) ; C95.2@72,75.8 72,76 v1(72.5,76.5) ; v1(75.2,25.4) J9.15@75.2,26.9 ; J9.9@77.6,26.9 v1@77.6,28.375 ; J9.4@79.6,35.1 v1(79.6,36.6) 79.8,36.8 C30.2@79.8,37.3 ; v1(79.8,94.8) 79.9,94.9 R162.2@79.9,95.4 ; v1(81.4,4.3) C173.2@81.4,5 ; TP10.1@88.6,76.3 v2(89.7,76.3) ; C69.2@90,54.5 90,54.7 v1(90.5,55.2) 90,55.7 R45.1@90,55.9 ; v1(91.115,38.475) J15.PC2@93,38.475 ; v1(91.215,44.825) J15.PC7@93,44.825 ; v1(91.215,56.255) J15.PC16@93,56.255 ; v1(91.4,29.9) 91.415,29.885 J15.S4@93,29.885 ; v1(91.4,33.7) 91.405,33.695 J15.S7@93,33.695 ; v1(91.425,26.075) J15.S1@93,26.075 ; J15.PC15@93,54.985 v1(94.785,54.985) ; v1(93.5,71.6) C118.1@94.2,71.6 ; C117.1@98.3,71.6 v1(99,71.6) ; v1(102.1,70.9) C116.1@102.1,71.6 ; C114.1@105.9,71.6 v1(106.6,71.6) ; v1(109.5,74.5) 110,74.5 R139.1@110.2,74.3 ; v1(110.8,77.8) 111,78 C182.2@111.6,78 ; v1(110.8,79.4) 110.9,79.3 C194.2@111.6,79.3 ; C115.2@112.4,98.4 v1(112.4,99.1) ; C195.2@112.8,75.1 112.8,74.6 v1(112.9,74.5) ; v1(112.9,43.4) 113.1,43.6 C49.2@113.1,44.3 ; R131.2@114.5,74.4 114.5,73.8 v1(114.7,73.6) ; R130.1@115.9,85.7 v1(115.9,86.3) ; Y1.2@117.05,42.83 v1@118.21,43.99 ; R132.1@117.4,85.7 v1(117.4,86.3) ; C181.2@120.9,79.1 v1(121.5,79.1) ; C83.2@128.6,75.6 v1(128.6,76.4)
  L6 w0.8: v2(53.6,99.7) D10.3@55,99.7
  other v1: 45.5,0.8 47.7,0.8 59.1,0.9 59.1,2.4 80.4,8.9 10.7,9.3 11.7,9.3 5.3,9.9 81.4,9.9 5.3,10.9 61,11.8 3.1,14.6 4,14.6 57.6,14.8 117.6,16.2 118.7,16.2 98.3,16.6 8.6,16.8 9.6,16.8 117.6,17.3 60.2,17.4 16.6,18.4 17.3,18.4 53.5,20.4 5.8,22 7.8,22 64.1,23.2 65.4,23.2 4,23.6 64.1,24.3 65.4,24.3 4,24.6 52.8,26.6 82.1,26.6 20.9,26.8 122,27 124.2,27 52.8,27.7 50.2,27.9 5.9,28 7.9,28 20.9,28.2 77.6,28.4 82,29 32.7,29.1 34.1,29.1 34.9,29.1 36.3,29.1 37.3,29.1 38.3,29.1 3.6,29.2 122,29.2 124.2,29.2 50.1,29.6 3.6,30.2 100.45,30.25 103,30.3 68.2,31.5 69.4,31.5 70.4,31.5 71.5,31.5 72.5,31.5 73.6,31.5 100.4,32.9 103,32.9 106.1,33.1 51.2,34.3 52.1,34.3 36.5,34.4 53.5,35 54.9,35 50.3,35.1 46.2,35.4 36.7,35.9 53.5,36 54.9,36 48.4,37.7 108.95,39.15 111.5,39.2 50.9,39.8 62.1,39.9 64.3,39.9 94.9,40.75 96.3,40.75 98,41.1 99.6,41.1 94.9,41.75 96.3,41.75 41.9,41.8 108.9,41.8 111.5,41.8 5.5,42.3 6.5,42.3 43.6,42.3 62.7,42.4 63.8,42.4 97.7,42.45 56.3,42.7 5.5,43.3 9.1,43.3 118.2,44 5.5,44.3 9.1,44.3 53.8,44.4 45.2,44.5 47.9,44.6 56.3,45 62.7,45.3 103,45.5 59.2,45.6 98.2,45.9 40.1,46.6 32.7,46.7 35.9,46.9 95,47.1 46.2,47.4 84.2,47.5 32.7,47.6 59.2,48 50.9,48.2 62.1,48.3 64.1,48.3 46.2,48.4 104.7,48.4 39.8,50.2 78.5,51.6 79.5,51.6 80.5,51.6 26.3,51.9 80.5,52.6 54.3,53.4 84.7,53.5 54.3,54.4 84.7,54.6 54.3,57.3 84.7,57.4 54.3,58.3 84.7,58.5 70.2,59.6 54.3,61.1 84.7,61.1 69.3,63.7 84.7,63.7 30,63.8 32,63.8 40.8,63.8 44,63.8 47.2,63.8 5.5,63.9 54.3,64.4 5.5,64.8 118.2,64.8 91.5,65.1 84.7,65.2 32.7,65.4 37.6,65.4 71.8,65.7 29.5,66.2 84.7,66.3 70.9,66.7 18.5,67.6 20.2,67.6 1.9,67.8 18.5,68.4 20.2,68.4 96.3,68.6 73,68.7 1.9,68.8 54.3,69.7 1.9,70.2 46.2,70.5 84.7,70.9 1.9,71.1 78.8,71.3 84.7,71.9 109.8,72.06 54.3,72.1 64.7,72.9 66.2,72.9 67.7,72.9 31,73.3 109.8,73.33 64.7,74.1 66.2,74.1 67.7,74.1 64.7,75.3 66.2,75.3 67.7,75.3 20.7,76.3 127.9,77 48.5,77.7 54.6,77.7 24.2,77.8 127.9,78 51,78.1 53,78.1 116,78.1 117.6,78.1 45.8,78.2 78.7,78.2 48.5,78.7 54.6,78.7 59.5,78.7 24.2,78.8 45.8,78.9 60.6,79.1 78.7,79.2 83.5,79.2 59.5,79.5 75.7,80.1 83.5,80.2 116,80.7 117.6,80.7 51.3,81.3 52.3,81.3 109.8,81.46 75.8,81.5 107,82.6 21.5,82.7 22.3,82.7 80.5,82.7 81.3,82.7 109.8,82.835 112,82.835 44.9,83.6 112,83.8 11.4,83.9 12.4,83.9 44.9,84.5 58.5,84.8 55.7,85.2 108.6,85.4 113.1,85.4 56.3,85.7 113.9,85.9 107,86 118.9,88.2 120.1,88.2 33.8,89.8 35.6,89.8 95.32,91.2 97.4,91.2 99.13,91.6 101.21,91.6 102.94,91.6 105.02,91.6 33.8,92 35.6,92 11.3,93.1 12.5,93.1 23.6,93.4 24.6,93.4 92.5,94.7 11.3,95.3 12.5,95.3 33.9,96.9 34.9,96.9 90.4,97.1 91.3,97.1
  other v2: 3.9,10.1 8.6,10.1 3.3,16.2 119.7,41.2 3.3,41.65 8.6,41.65 119.7,42.8 98.4,50.8 100,50.8 122.6,58.5 124.3,58.5 9.9,63.6 9.9,65.2 104.1,67 105.7,67 109,70.6 89.7,72.7 107.1,74 89.7,74.5 24.8,76.3 26.4,76.3 107,76.4 76.035,77.735 89.7,77.9 103.9,77.9 103.9,79.5 89.7,80.5 107,81.3 89.7,82.1 89.7,83.9 107,84.4 89.7,85.7 66.7,87.2 68.3,87.2 107,87.5 28.1,91.6 28.1,93.2 115.3,95.4 113.5,97 115.1,97 66.78,105.42 68.28,105.42
GPIO0: J34.2 R178.1 U19.1 | length 13.2
  L1 w0.24: 63.45,21.3 U19.1@63.45,21.75
  L1 w0.25: 63.45,21.3 63.25,21.1 60.2,21.1 59.5,20.4 R178.1@59.5,19.8 59.5,19.1 63.06,15.54 J34.2@65.2,15.54
GPIO1: J34.3 R177.1 U19.2 | length 14.3
  L1 w0.24: 63.95,21.2 U19.2@63.95,21.75
  L1 w0.25: 63.95,21.2 63.95,21.15 63.4,20.6 62.1,20.6 61.8,20.3 R177.1@61.8,19.8 61.8,18.6 63.5,16.9 65.9,16.9 66.5,16.3 66.5,14.24 J34.3@67.74,13
GPIO2: J34.4 R179.1 U19.3 | length 9
  L1 w0.24: 64.45,21.2 U19.3@64.45,21.75
  L1 w0.25: 64.45,21.2 64.45,20.8 64.1,20.45 R179.1@64.1,19.8 64.1,18.5 65,17.6 67,17.6 67.74,16.86 J34.4@67.74,15.54
GPIO3: J34.5 R180.2 U19.4 | length 11.8
  L1 w0.24: 64.95,21.2 U19.4@64.95,21.75
  L1 w0.25: 64.95,21.2 64.95,20.85 65.4,20.4 R180.2@65.4,19.8 65.4,19 66,18.4 67.4,18.4 69,16.8 69,14.28 J34.5@70.28,13
GPIO4: J34.6 R182.2 U19.5 | length 9.3
  L1 w0.24: U19.5@65.45,21.75 65.45,21.15 65.6,21
  L1 w0.25: 65.6,21 66,20.6 67.3,20.6 67.7,20.2 R182.2@67.7,19.8 67.7,19 68.3,18.4 68.9,18.4 70.28,17.02 J34.6@70.28,15.54
GPIO5: J34.7 R181.2 U19.6 | length 13.5
  L1 w0.24: U19.6@65.95,21.75 65.95,21.35 66.1,21.2 66.2,21.2
  L1 w0.25: 66.2,21.2 69.3,21.2 70,20.5 R181.2@70,19.8 70,18.7 71.6,17.1 71.6,14.22 J34.7@72.82,13
GPIO6: J33.7 R175.1 U19.7 | length 24.1
  L1 w0.24: U19.7@66.65,22.45 67.2,22.45
  L1 w0.25: 67.2,22.45 67.9,22.45 68.55,21.8 70.7,21.8 71.6,20.9 72.6,20.9 73.2,20.3 73.2,19.9 R175.1@73.3,19.8 v1(74.1,19.8)
  L6 w0.25: J33.7@70.38,6 70.38,7.88 74.1,11.6 v1(74.1,19.8)
GPIO7: J33.9 R176.2 U19.8 | length 25.4
  L1 w0.24: U19.8@66.65,22.95 67.2,22.95
  L1 w0.25: 67.2,22.95 68.35,22.95 68.8,22.5 72,22.5 73.3,21.2 R176.2@73.7,21.2 v1(73.7,20.5)
  L6 w0.25: J33.9@67.84,6 67.84,8.14 71.6,11.9 71.6,16.605 73.15,18.155 73.15,19.957 73.693,20.5 v1(73.7,20.5)
HDMI_CEC_CON: J16.13 R50.2 U7.23 | length 13.5
  L1 w0.25: J16.13@80.8,99.14 U7.23@80.8,95.85 80.8,93.7 83.5,91 86.7,91 87.1,91.4 R50.2@87.1,91.9
HDMI_CEC_IN: J1.44 U7.16 | length 48.8
  L1 w0.25: U7.16@80.8,90.15 v1(80.8,91.2) ; v1(86.73,65.75) J1.44@87.79,65.75
  L3 w0.2: v1(80.8,91.2) 81.3,90.7 83.8,90.7 84.4,91.3 87.7,91.3 91.4,87.6 91.4,82.6 94.65,79.35 94.65,75.85 97.3,73.2 97.3,68.9 v1(92.8,64.4)
  L6 w0.25: v1(86.73,65.75) 87.45,65.75 88.8,64.4 v1(92.8,64.4)
HDMI_CLK_N: J1.45 J16.12 U7.15 U7.24 | length 48
  L1 w0.25: v1(79.3,83.2) 79.3,83.7 79.75,84.15 83.169,84.15 83.95,84.931 83.95,86.55 82.85,87.65 80.625,87.65 80.125,88.15 80.125,88.7 80.3,88.875 U7.15@80.3,90.15 80.3,90.999 80.125,91.174 80.125,94.4 80.3,94.575 80.3,94.8 U7.24@80.3,95.85 80.3,96.579 80.125,96.754 80.125,97.524 80.3,97.699 J16.12@80.3,99.14 ; J1.45@81.61,66.25 82.7,66.25 v1(82.75,66.2)
  L3 w0.2: v1(79.3,83.2) 79.325,83.175 79.325,80.275 80.15,79.45 82.44,79.45 86.3,75.59 86.3,70.51 85.49,69.7 85,69.7 84.7,69.4 84.7,66.972 83.928,66.2 v1(82.75,66.2)
HDMI_CLK_P: J1.47 J16.10 U7.13 U7.26 | length 48
  L1 w0.25: v1(78.65,83.2) 78.65,83.969 79.481,84.8 82.9,84.8 83.3,85.2 83.3,86.281 82.581,87 80.356,87 79.475,87.881 79.475,88.718 79.3,88.893 U7.13@79.3,90.15 79.3,90.999 79.475,91.174 79.475,94.4 79.3,94.575 U7.26@79.3,95.85 ; J16.10@79.3,99.14 79.3,97.699 79.475,97.524 79.475,96.754 79.3,96.579 U7.26@79.3,95.85 ; J1.47@81.61,66.75 82.7,66.75 v1(82.75,66.8)
  L3 w0.2: v1(78.65,83.2) 78.625,83.175 78.625,79.985 79.86,78.75 82.15,78.75 85.6,75.3 85.6,73.6 85.4,73.4 85.05,73.4 84.75,73.1 84.75,72.7 85.05,72.4 85.4,72.4 85.6,72.2 85.6,70.8 85.2,70.4 84.71,70.4 84,69.69 84,67.262 83.638,66.9 82.85,66.9 v1(82.75,66.8)
HDMI_D0_N: J1.39 J16.9 U7.12 U7.27 | length 47.9
  L1 w0.25: v1(76.894,84.144) 76.894,84.375 78.625,86.106 78.625,89.025 78.8,89.2 U7.12@78.8,90.15 78.8,91.407 78.625,91.582 78.625,94.946 78.8,95.121 U7.27@78.8,95.85 J16.9@78.8,99.14 ; v1(77.6,67.5) 77.981,67.5 78.95,66.531 78.95,65.931 80.131,64.75 J1.39@81.61,64.75
  L3 w0.2: v1(76.894,84.144) 76.919,84.119 76.919,82.771 77.119,82.571 77.119,80.9 76.9,80.681 76.9,79.19 78.89,77.2 81.1,77.2 83.105,75.195 83.105,73.815 82.39,73.1 81.8,73.1 81.2,72.5 81.2,71.19 82.3,70.09 82.3,68.31 81.49,67.5 v1(77.6,67.5)
HDMI_D0_P: J1.41 J16.7 U7.10 U7.29 | length 47.9
  L1 w0.25: v1(76.244,84.144) 76.244,84.644 77.975,86.375 77.975,89.025 77.8,89.2 U7.10@77.8,90.15 77.8,91.407 77.975,91.582 77.975,94.946 77.8,95.121 U7.29@77.8,95.85 J16.7@77.8,99.14 ; v1(77.6,68.15) 78.25,68.15 79.6,66.8 79.6,66.2 80.55,65.25 J1.41@81.61,65.25
  L3 w0.2: v1(76.244,84.144) 76.219,84.119 76.219,82.481 76.419,82.281 76.419,81.19 76.2,80.971 76.2,78.9 78.6,76.5 80.81,76.5 82.405,74.905 82.405,74.105 82.1,73.8 81.51,73.8 80.5,72.79 80.5,70.9 81.6,69.8 81.6,68.6 81.2,68.2 80.825,68.2 80.625,68.4 80.625,68.725 80.325,69.025 79.925,69.025 79.625,68.725 79.625,68.4 79.425,68.2 77.65,68.2 v1(77.6,68.15)
HDMI_D1_N: J1.46 J16.6 U7.9 U7.30 | length 47.9
  L1 w0.25: v1(73.5,85.35) 75.269,85.35 76.25,86.331 76.25,87.231 77.125,88.106 77.125,88.718 77.3,88.893 U7.9@77.3,90.15 77.3,90.999 77.125,91.174 77.125,94.418 77.3,94.593 U7.30@77.3,95.85 77.3,96.699 77.125,96.874 77.125,97.524 77.3,97.699 J16.6@77.3,99.14 ; J1.46@87.79,66.25 88.88,66.25 v1(88.93,66.2)
  L3 w0.2: v1(73.5,85.35) 73.525,85.325 74.435,85.325 75.11,84.65 80.35,84.65 86.125,78.875 86.125,78.385 88,76.51 88,69.79 87.5,69.29 87.5,66.81 88.16,66.15 88.88,66.15 v1(88.93,66.2)
HDMI_D1_P: J1.48 J16.4 U7.7 U7.32 | length 47.9
  L1 w0.25: v1(73.5,86) 73.5,86.5 73.775,86.775 74.125,86.775 74.4,86.5 74.4,86.25 74.65,86 75,86 75.6,86.6 75.6,87.5 76.475,88.375 76.475,88.7 76.3,88.875 U7.7@76.3,90.15 76.3,90.999 76.475,91.174 76.475,94.418 76.3,94.593 U7.32@76.3,95.85 76.3,96.699 76.475,96.874 76.475,97.524 76.3,97.699 J16.4@76.3,99.14 ; J1.48@87.79,66.75 88.88,66.75 v1(88.93,66.8)
  L3 w0.2: v1(73.5,86) 73.525,86.025 74.725,86.025 75.4,85.35 80.64,85.35 86.825,79.165 86.825,78.675 88.7,76.8 88.7,69.5 88.2,69 88.2,67.1 88.45,66.85 88.88,66.85 v1(88.93,66.8)
HDMI_D2_N: J1.40 J16.3 U7.6 U7.33 | length 48
  L1 w0.25: v1(75.625,88.7) 75.625,89.125 75.8,89.3 U7.6@75.8,90.15 75.8,91.407 75.625,91.582 75.625,94.824 75.8,94.999 U7.33@75.8,95.85 J16.3@75.8,99.14 ; J1.40@87.79,64.75 89.15,64.75 89.55,65.15 v1(90,65.15)
  L3 w0.2: v1(75.625,88.7) 75.65,88.675 75.65,88.025 75.975,87.7 81.89,87.7 88.8,80.79 88.8,80.29 89.59,79.5 90.2,79.5 91.4,78.3 91.4,65.802 90.748,65.15 v1(90,65.15)
HDMI_D2_P: J1.42 J16.1 U7.4 U7.35 | length 47.9
  L1 w0.25: J16.1@74.8,99.14 U7.35@74.8,95.85 74.8,94.999 74.975,94.824 74.975,91.582 74.8,91.407 U7.4@74.8,90.15 74.8,89.3 74.975,89.125 v1(74.975,88.7) ; J1.42@87.79,65.25 88.731,65.25 89.281,65.8 v1(90,65.8)
  L3 w0.2: v1(74.975,88.7) 74.95,88.675 74.95,87.735 75.685,87 81.6,87 88.1,80.5 88.1,80 89.3,78.8 89.91,78.8 90.7,78.01 90.7,68.8 90.5,68.6 90.175,68.6 89.875,68.3 89.875,67.9 90.175,67.6 90.5,67.6 90.7,67.4 90.7,66.1 90.45,65.85 90.05,65.85 v1(90,65.8)
HDMI_HPD: J1.43 U7.19 | length 54.1
  L1 w0.25: J1.43@81.61,65.75 82.493,65.75 82.543,65.7 v1@83.8,65.7 ; U7.19@82.3,90.15 v1(82.3,91.2)
  L3 w0.2: v1(82.3,91.2) 83.1,92 87.8,92 92.4,87.4 92.4,82.9 98.1,77.2 98.1,68.5 93.2,63.6 v1(92.2,63.6)
  L6 w0.25: v1@83.8,65.7 86,65.7 86.8,64.9 87.4,64.9 88.7,63.6 v1(92.2,63.6)
  other v1: 83.7,65.7
HDMI_HPD_CON: C108.1 J16.19 R47.2 U7.20 | length 7.7
  L1 w0.25: U7.20@82.3,95.85 82.3,95.1 83,94.4 83.9,94.4 C108.1@84.3,94.8 ; J16.19@83.8,99.14 83.8,97.5 84.3,97 R47.2@84.3,96.2 C108.1@84.3,94.9
HDMI_SCL_CON: J16.15 R163.1 | length 2.9
  L1 w0.25: v1(81.8,97.1) J16.15@81.8,99.14
  L6 w0.25: R163.1@81.5,96.4 81.5,96.8 v1(81.8,97.1)
HDMI_SCL_CON_R: R49.1 R163.2 U7.22 | length 7
  L1 w0.25: U7.22@81.3,95.85 v1(81.3,94.1) 83.5,91.9 R49.1@84.3,91.9
  L6 w0.25: v1(81.3,94.1) 81.3,95.2 R163.2@81.5,95.4
HDMI_SDA_CON: J16.16 R164.1 | length 3.1
  L1 w0.25: v1(82.3,97.5) J16.16@82.3,99.14
  L6 w0.25: v1(82.3,97.5) 82.3,97.2 R164.1@83.1,96.4
HDMI_SDA_CON_R: R48.1 R164.2 U7.21 | length 6
  L1 w0.25: U7.21@81.8,95.85 81.8,94.7 83.1,93.4 R48.1@84.3,93.4
  L6 w0.25: v1(81.8,94.7) 82.8,94.7 83.1,95 R164.2@83.1,95.4
HP_AMP_OUTL: R89.1 U4.16 | length 45
  L1 w0.28: U4.16@125.575,29.85 126.1,29.85 126.45,30.2 v1@126.45,30.3
  L1 w0.3: R89.1@93.2,28.3 94.4,28.3 v1(94.7,28)
  L3 w0.3: v1(94.7,28) 95.9,26.8 99.6,26.8 106,20.4 121.9,20.4 123.6,22.1 123.6,24 125.4,25.8 125.4,29.35 v1(126.45,30.4)
HP_AMP_OUTR: R88.1 U4.15 | length 49.5
  L1 w0.28: U4.15@125.575,29.35 126.35,29.35 v1(126.45,29.45)
  L1 w0.3: v1(89.8,27.5) R88.1@89.8,28.3
  L3 w0.3: v1(89.8,27.5) 92,27.5 93.4,26.1 95.7,26.1 96.4,25.4 99.6,25.4 105.925,19.075 121.711,19.075 124.5,21.864 124.5,23.7 126.45,25.65 v1(126.45,29.45)
HP_INL: C136.2 U4.27 | length 33.5
  L1 w0.28: v1(118,29.1) 119.1,29.1 119.35,28.85 U4.27@120.625,28.85
  L1 w0.3: v1(94.9,28.9) C136.2@94.9,29.6
  L3 w0.3: v1(94.9,28.9) 96.6,28.9 97,28.5 99.3,28.5 100.8,27 103.958,27 108.358,22.6 113,22.6 116,25.6 116,28.4 116.7,29.1 v1(118,29.1)
HP_INR: C138.2 U4.26 | length 34
  L1 w0.28: v1(118,29.9) 119.15,29.9 119.7,29.35 U4.26@120.625,29.35
  L1 w0.3: v1(94.9,31.5) C138.2@94.9,32.2
  L3 w0.3: v1(94.9,31.5) 94.9,30.8 95.7,30 99.2,30 101,28.2 104.9,28.2 109.2,23.9 112.5,23.9 114.9,26.3 114.9,28.6 116.2,29.9 v1(118,29.9)
HP_OUT_L: C121.1 C125.1 C137.2 FB9.1 R89.2 R91.2 | length 12.6
  L1 w0.3: FB9.1@91.4,18.3 91.4,21.8 92.2,22.6 R89.2@92.2,28.3 92.2,29.625 C137.2@92.9,30.325
HP_OUT_R: C120.1 C124.1 C139.2 FB8.1 R88.2 R90.2 | length 12.6
  L1 w0.3: FB8.1@90,18.3 R90.2@90,19.8 90,21.7 90.8,22.5 C120.1@90.8,26.8 90.8,29.625 C139.2@90.1,30.325
HUB_LED: D12.2 R78.1 | length 41.5
  L1 w0.25: D12.2@46,107.9 46.6,107.9 47.1,107.4 v1(47.1,104) ; v1(70.9,84.8) 70.9,84.5 71.8,83.6 R78.1@71.8,82.8
  L3 w0.2: v1(47.1,104) 48.3,102.8 57.5,102.8 66,94.3 66,92.5 67.5,91 67.5,89.3 70,86.8 70,85.7 v1(70.9,84.8)
I2C1_SCL: J2.14 U14.29 | length 71.2
  L1 w0.25: J2.14@57.39,58.25 64.25,58.25 64.9,58.9 68.9,58.9 71,56.8 71,47.7 78.5,40.2 87.4,40.2 v1(87.9,40.7) ; U14.29@101.45,34.05 v1(101.45,35.15)
  L3 w0.2: v1(87.9,40.7) 91,40.7 92,39.7 96.4,39.7 97.2,40.5 97.2,41.007 99.393,43.2 v1(99.8,43.2)
  L6 w0.25: v1(99.8,43.2) 99.393,43.2 97.5,41.307 97.5,37.3 98.6,36.2 99.3,36.2 100.35,35.15 v1(101.45,35.15)
I2C1_SDA: J2.12 U14.27 | length 69.6
  L1 w0.25: J2.12@57.39,57.75 60.7,57.75 61.05,57.4 64.4,57.4 65.2,58.2 68.6,58.2 70.3,56.5 70.3,50.9 70,50.6 70,47.6 78.2,39.4 88,39.4 v1(88.5,39.9) ; U14.27@102.45,34.05 v1(102.45,34.85)
  L3 w0.2: v1(88.5,39.9) 88.9,39.5 91,39.5 92.7,37.8 95.593,37.8 99.793,42 v1(99.8,42)
  L6 w0.25: v1(99.8,42) 99.793,42 98.4,40.607 98.4,38.4 100.9,35.9 101.407,35.9 102.45,34.857 v1(102.45,34.85)
I2C2_SCL: J1.36 J3.B5 J4.30 J9.30 R160.1 U2.12 U6.6 U7.17 U17.6 U18.6 U19.19 | length 424
  L1 w0.24: 62.2,24.95 U19.19@62.75,24.95
  L1 w0.25: v1(31,37.1) 31,36.5 29.7,35.2 23,35.2 18.1,30.3 18.1,27.1 17.1,26.1 v1(17.1,23.1) 17.1,22 21.4,17.7 44.7,17.7 46.5,19.5 51.4,19.5 52,18.9 54.8,18.9 55.3,19.4 55.3,22.3 56.1,23.1 v1(57,23.1) 58.85,24.95 62.2,24.95 ; R160.1@65.4,37.7 66,37.1 v1(66,36.6) ; U7.17@81.3,90.15 v1(81.3,92.4) ; J1.36@87.79,63.75 89.15,63.75 91.3,61.6 91.3,60.734 93.934,58.1 99.5,58.1 100,57.6 v1(100.7,57.6) ; U18.6@107.2,52.625 v1(108.1,52.625) ; U6.6@117.3,50.775 118.475,50.775 119,51.3 v1(119,52.4)
  L3 w0.2: v1(41,84.7) 41,85.2 40.4,85.8 35.9,85.8 31.1,90.6 26.3,90.6 24.8,92.1 21.8,92.1 18.2,95.7 14,95.7 12.6,94.3 11.1,94.3 10.425,93.625 8.725,93.625 7.725,92.625 5.875,92.625 4.85,93.65 J3.B5@4.75,93.65 3.775,94.625 3.775,98.275 4.4,98.9 6.166,98.9 13.666,106.4 59.6,106.4 66.3,99.7 67.7,99.7 v1(68.4,100.4) ; v1(57,23.1) 57,23.9 57.866,24.766 57.866,28.466 60.6,31.2 61,31.2 66,36.2 v1(66,36.6) ; v1(81.3,92.4) 82.9,94 87.7,94 88.934,92.766 91.234,92.766 103.1,80.9 103.1,72.593 107.7,67.993 107.7,63.328 112.128,58.9 116.793,58.9 117.293,58.4 117.3,58.4 121,54.7 121,52.9 120.5,52.4 v1(119,52.4) 118.4,52.4 118.175,52.625 v1(108.1,52.625) 107.575,52.625 106.5,53.7 106.5,54.8 103.7,57.6 v1(100.7,57.6)
  L6 w0.25: v1(17.1,23.1) 17.325,23.325 U2.12@19.1,23.325 ; J4.30@31,35.1 31,42.1 28.1,45 23.1,45 21.7,46.4 21.7,53.7 27.8,59.8 32,59.8 33.4,61.2 33.4,63.993 32.293,65.1 30.6,65.1 30,65.7 30,67 30.6,67.6 32.3,67.6 34.4,69.7 34.4,73.607 35.193,74.4 35.2,74.4 36.1,75.3 36.1,76.2 37.835,77.935 U17.6@38.9,77.935 39.935,77.935 41,79 v1@41,84.5 ; J9.30@66,35.1 v1(66,36.6) ; v1(68.4,100.4) 69.3,99.5 69.3,96.3 70.5,95.1 70.5,92.407 71.607,91.3 73.2,91.3 73.9,90.6 79.493,90.6 81.293,92.4 v1(81.3,92.4)
I2C2_SDA: J1.38 J3.B6 J4.32 J9.32 R161.1 U2.11 U6.5 U7.18 U17.5 U18.5 U19.20 | length 432.9
  L1 w0.24: 62.2,24.45 U19.20@62.75,24.45
  L1 w0.25: v1(30.2,37.7) 30.2,36.693 29.507,36 22.7,36 17.4,30.7 17.4,27.5 16.5,26.6 v1(16.5,22.7) 16.5,21.6 16.95,21.15 16.957,21.15 21.307,16.8 45.2,16.8 47.1,18.7 51,18.7 51.4,18.3 55.5,18.3 56.1,18.9 v1(56.1,22.2) ; 56.3,22.4 57.65,22.4 59.7,24.45 62.2,24.45 ; R161.1@63.8,37.7 64.107,37.7 65.2,36.607 v1(65.2,36.6) ; U7.18@81.8,90.15 v1(81.8,91.8) ; J1.38@87.79,64.25 89.65,64.25 92,61.9 92,60.9 94.1,58.8 100,58.8 v1@100.5,58.3 ; U18.5@107.2,53.275 v1(108.1,53.275) ; U6.5@117.3,50.125 118.925,50.125 119.8,51 v1(119.8,53)
  L3 w0.2: v1(40,84.7) 39.6,85.1 35.4,85.1 31.1,89.4 26.2,89.4 24.5,91.1 21.3,91.1 18.3,94.1 17.3,94.1 16.2,93 13.6,93 13,92.4 11.2,92.4 10.475,91.675 8.775,91.675 7.775,90.675 4.125,90.675 3.7,91.1 3.7,91.7 J3.B6@2.75,92.65 1.5,93.9 1.5,97.3 3.8,99.6 5.5,99.6 13.2,107.3 60.4,107.3 67.3,100.4 v1(67.4,100.4) ; v1(56.1,22.2) 56.1,24.3 56.9,25.1 56.9,28.3 v1(65.2,36.6) ; v1@81.8,91.7 v1@81.85,91.75 ; v1(81.8,91.8) 81.9,91.8 83.3,93.2 87.6,93.2 88.7,92.1 90.9,92.1 102.2,80.8 102.2,72.307 106.9,67.607 106.9,62.9 111.9,57.9 116.607,57.9 120.3,54.207 120.3,53.4 119.9,53 v1(119.8,53) 118.966,53 118.191,53.775 109.275,53.775 108.775,53.275 v1(108.1,53.275) 108.025,53.275 107.2,54.1 107.2,55.2 104.1,58.3 v1(100.4,58.3)
  L6 w0.25: v1(16.5,22.7) 16.5,23.307 17.093,23.9 17.1,23.9 17.2,24 19.075,24 U2.11@19.1,23.975 ; J4.32@30.2,35.1 v1(30.2,37.7) 30.2,41.8 27.8,44.2 22.6,44.2 20.7,46.1 20.7,53.9 27.5,60.7 31.9,60.7 32.7,61.5 32.7,63.9 32.2,64.4 30.2,64.4 29,65.6 29,67 30.3,68.3 31.9,68.3 33.7,70.1 33.7,74 35.3,75.6 35.3,76.5 38.005,79.205 U17.5@38.9,79.205 39.705,79.205 40,79.5 v1@40,84.5 ; J9.32@65.2,35.1 v1(65.2,36.6) ; v1(67.4,100.4) 68.525,99.275 68.525,95.875 69.8,94.6 69.8,91.6 71,90.4 72.8,90.4 73.4,89.8 80.107,89.8 81.8,91.493 v1@81.8,91.7
I2C2_VREF2: C57.1 R17.1 U6.7 U6.8 | length 7.1
  L1 w0.3: U6.7@117.3,51.425 116.375,51.425 116,51.8 116,52.4 116.325,52.075 U6.8@117.3,52.075
  L1 w0.4: R17.1@113.7,54 C57.1@115.2,54 115.5,54 116,53.5 116,52.4
I2C3_SCL: J2.19 J34.10 | length 104.6
  L1 w0.25: J2.19@51.21,59.75 v1(52.87,59.75)
  L3 w0.2: v1(70.5,49.9) 70.6,49.8 70.6,44.007 65.4,38.807 65.4,38.407 59.593,32.6 59,32.6 58.375,31.975 58.375,31.175 54.4,27.2 51.8,27.2 48.45,23.85 48.45,17.143 50.293,15.3 54.4,15.3 56.7,13 58.6,13 59.3,13.7 61.4,13.7 62.2,14.5 62.2,16 64,17.8 71.7,17.8 72.5,17 73.9,17 J34.10@75.36,15.54
  L6 w0.25: v1(52.87,59.75) 52.87,59 50.9,57.03 50.9,56 55,51.9 63.4,51.9 65.1,50.2 70.2,50.2 v1(70.5,49.9)
I2C3_SDA: J2.17 J34.8 | length 104.3
  L1 w0.25: J2.17@51.21,59.25 v1(52.27,59.25)
  L3 w0.2: v1(69.5,49.1) 70,48.6 70,44.4 64.8,39.2 64.393,39.2 63.6,38.407 63.6,37.466 61.734,35.6 61,35.6 58.1,32.7 56.018,32.7 55.4,32.082 55.4,29.5 54.15,28.25 51.743,28.25 47.7,24.207 47.7,16.7 49.8,14.6 53.9,14.6 56.4,12.1 59.6,12.1 60.35,12.85 62.05,12.85 63.2,14 63.2,15.6 64.6,17 71.36,17 J34.8@72.82,15.54
  L6 w0.25: v1(52.27,59.25) 50.2,57.18 50.2,53.9 52,52.1 53.2,52.1 54.3,51 63,51 64.9,49.1 v1(69.5,49.1)
JTAG_DACK: J36.19 R122.2 | length 5
  L6 w0.25: J36.19@21.14,15 21.14,16.24 23.2,18.3 R122.2@23.2,19.1
JTAG_DE: J36.17 R118.1 | length 4.9
  L6 w0.25: J36.17@23.68,15 23.68,16.28 25.6,18.2 R118.1@25.6,19.1
JTAG_NSRST: J36.15 R120.2 | length 4.8
  L6 w0.25: J36.15@26.22,15 26.22,16.12 28,17.9 R120.2@28,19.1
JTAG_NTRST: J2.41 J36.3 | length 78.4
  L1 w0.25: v1(48.65,65.25) J2.41@51.21,65.25
  L3 w0.2: J36.3@41.46,15 44.2,17.74 44.2,23 44.9,23.7 44.9,25.207 45.593,25.9 46.2,25.9 49.4,29.1 49.4,29.7 50.3,30.6 50.3,31.707 51.293,32.7 52.9,32.7 54.3,34.1 54.3,35.107 54.693,35.5 55.7,35.5 56.2,36 58.107,36 61.2,39.093 61.2,48.6 59.2,50.6 59.2,57.5 60.3,58.6 60.3,63.2 59.6,63.9 59.6,64.4 56.8,67.2 55,67.2 54.8,67.4 54.8,67.407 54.457,67.75 50.55,67.75 48.65,65.85 v1(48.65,65.25)
JTAG_RSTN: R120.1 R187.1 U24.2 | length 5.7
  L6 w0.25: R120.1@29,19.1 29,20.6 31.8,20.6 32.1,20.9 U24.2@32.1,21.85
JTAG_RTCK: J36.11 R121.2 | length 4.4
  L6 w0.25: J36.11@31.3,15 31.3,17.2 32,17.9 R121.2@32,19.1
JTAG_TCK: J2.43 J36.9 | length 77.9
  L1 w0.25: v1(50.15,65.75) J2.43@51.21,65.75
  L3 w0.2: J36.9@33.84,15 33.84,17.04 38.7,21.9 40.1,21.9 40.8,22.6 40.8,24.307 44.4,27.907 44.4,32.1 45.4,33.1 46.4,33.1 47.1,33.8 48.2,33.8 48.5,34.1 48.5,34.7 48.2,35 47.1,35 46.8,35.3 46.8,35.9 47.1,36.2 51.8,36.2 54.7,39.1 56.5,39.1 58.1,40.7 58.1,48.5 57.1,49.5 57.1,58.05 58,58.95 58,63.918 56.418,65.5 52.7,65.5 51.8,66.4 50.8,66.4 v1(50.15,65.75)
JTAG_TDI: J2.47 J36.5 | length 77.9
  L1 w0.25: J2.47@51.21,66.75 v1@53.27,66.75
  L3 w0.2: J36.5@38.92,15 39.7,15.78 39.7,19.6 40,19.9 40.6,19.9 40.9,19.6 40.9,17.4 41.2,17.1 41.8,17.1 42.1,17.4 42.1,18.4 42.9,19.2 42.9,23 44.3,24.4 44.3,25.5 46.55,27.75 46.55,28.75 48.6,30.8 48.6,32.5 49.6,33.5 52.057,33.5 52.7,34.143 52.7,35 53.2,35.5 53.707,35.5 54.2,35.993 54.2,36.2 55.1,37.1 57.8,37.1 60.3,39.6 60.3,48.5 58.5,50.3 58.5,57.6 59.53,58.63 59.53,62.516 59.046,63 59.046,64.254 56.6,66.7 53.42,66.7 v1(53.37,66.75)
JTAG_TDO: J2.45 J36.13 | length 77.8
  L1 w0.25: v1(49.3,65.75) 49.8,66.25 J2.45@51.21,66.25
  L3 w0.2: J36.13@28.76,15 30.36,16.6 31.7,16.6 38.35,23.25 38.35,24.05 41.9,27.6 42.7,27.6 43.5,28.4 43.5,33.7 45,35.2 45,36.7 45.5,37.2 51.7,37.2 54.3,39.8 55.8,39.8 56.8,40.8 56.8,48.3 56.43,48.67 56.43,58.38 57.22,59.17 57.22,62.5 57.384,62.664 57.384,63.969 56.453,64.9 50.15,64.9 v1(49.3,65.75)
JTAG_TMS: J2.49 J36.7 | length 77.9
  L1 w0.25: J2.49@51.21,67.25 v1(52.77,67.25)
  L3 w0.2: J36.7@36.38,15 36.38,17.98 36.68,18.28 37.28,18.28 37.58,17.98 37.58,16.62 37.88,16.32 38.48,16.32 38.78,16.62 38.78,20.08 39.6,20.9 41.3,20.9 41.85,21.45 41.85,23.15 43.5,24.8 43.5,25.7 45.2,27.4 45.2,31.7 45.9,32.4 46.8,32.4 47.5,33.1 48.5,33.1 49.6,34.2 50.2,34.2 51.636,35.636 52.3,35.636 53.164,36.5 53.6,36.5 54.986,37.886 56.9,37.886 59.7,40.686 59.7,48.3 57.8,50.2 57.8,57.9 58.76,58.86 58.76,62.432 58.492,62.7 58.492,64.108 56.4,66.2 53.2,66.2 52.77,66.63 v1(52.77,67.25)
JTAG_VREF: J36.1 R119.1 | length 4.1
  L6 w0.5: J36.1@44,15 R119.1@44,19.1
LED_MPCIE1_WLAN: J4.44 R21.1 | length 72.7
  L1 w0.25: v1(50.8,12.3) 51.093,12.3 51.7,11.693 R21.1@51.7,10.8
  L3 w0.2: v1(25.4,36.6) 25.4,32.4 24.6,31.6 24.6,29.4 27.6,26.4 28.8,26.4 29.6,25.6 29.6,23.5 28.1,22 28.1,20.927 24.973,17.8 21.7,17.8 19.6,15.7 19.6,11.6 20.25,10.95 22.15,10.95 23.1,10 24.3,10 25,9.3 27.6,9.3 28,8.9 33,8.9 33.3,8.6 41.1,8.6 41.5,9 49.3,9 50.8,10.5 v1(50.8,12.3)
  L6 w0.25: J4.44@25.4,35.1 v1(25.4,36.6)
LED_MPCIE1_WPAN: J4.46 R22.1 | length 77.1
  L1 w0.25: v1(51.8,12.3) 52.6,12.3 53.2,11.7 R22.1@53.2,10.8
  L3 w0.2: v1(24.6,36.6) 24.6,32.9 23.8,32.1 23.8,29 26.9,25.9 28.307,25.9 28.9,25.307 28.9,23.9 27.2,22.2 27.2,21 25,18.8 21,18.8 18.5,16.3 18.5,11.5 19.9,10.1 21.8,10.1 22.6,9.3 23.7,9.3 24.5,8.5 27.5,8.5 28.1,7.9 41.5,7.9 41.9,8.3 50.2,8.3 51.8,9.9 v1(51.8,12.3)
  L6 w0.25: J4.46@24.6,35.1 v1(24.6,36.6)